# Altium PCB LST.PcbDoc (part 6 of 6)
Units mil, origin at the board's own origin, x right, y up, seen from the top; angles counter-clockwise.
Board outline 4330.71 x 4330.71 mil, 2 copper layers (Top Layer, Bottom Layer), stack 50 mil thick; 464 components, 242 nets, 1328 pads, 128 vias.
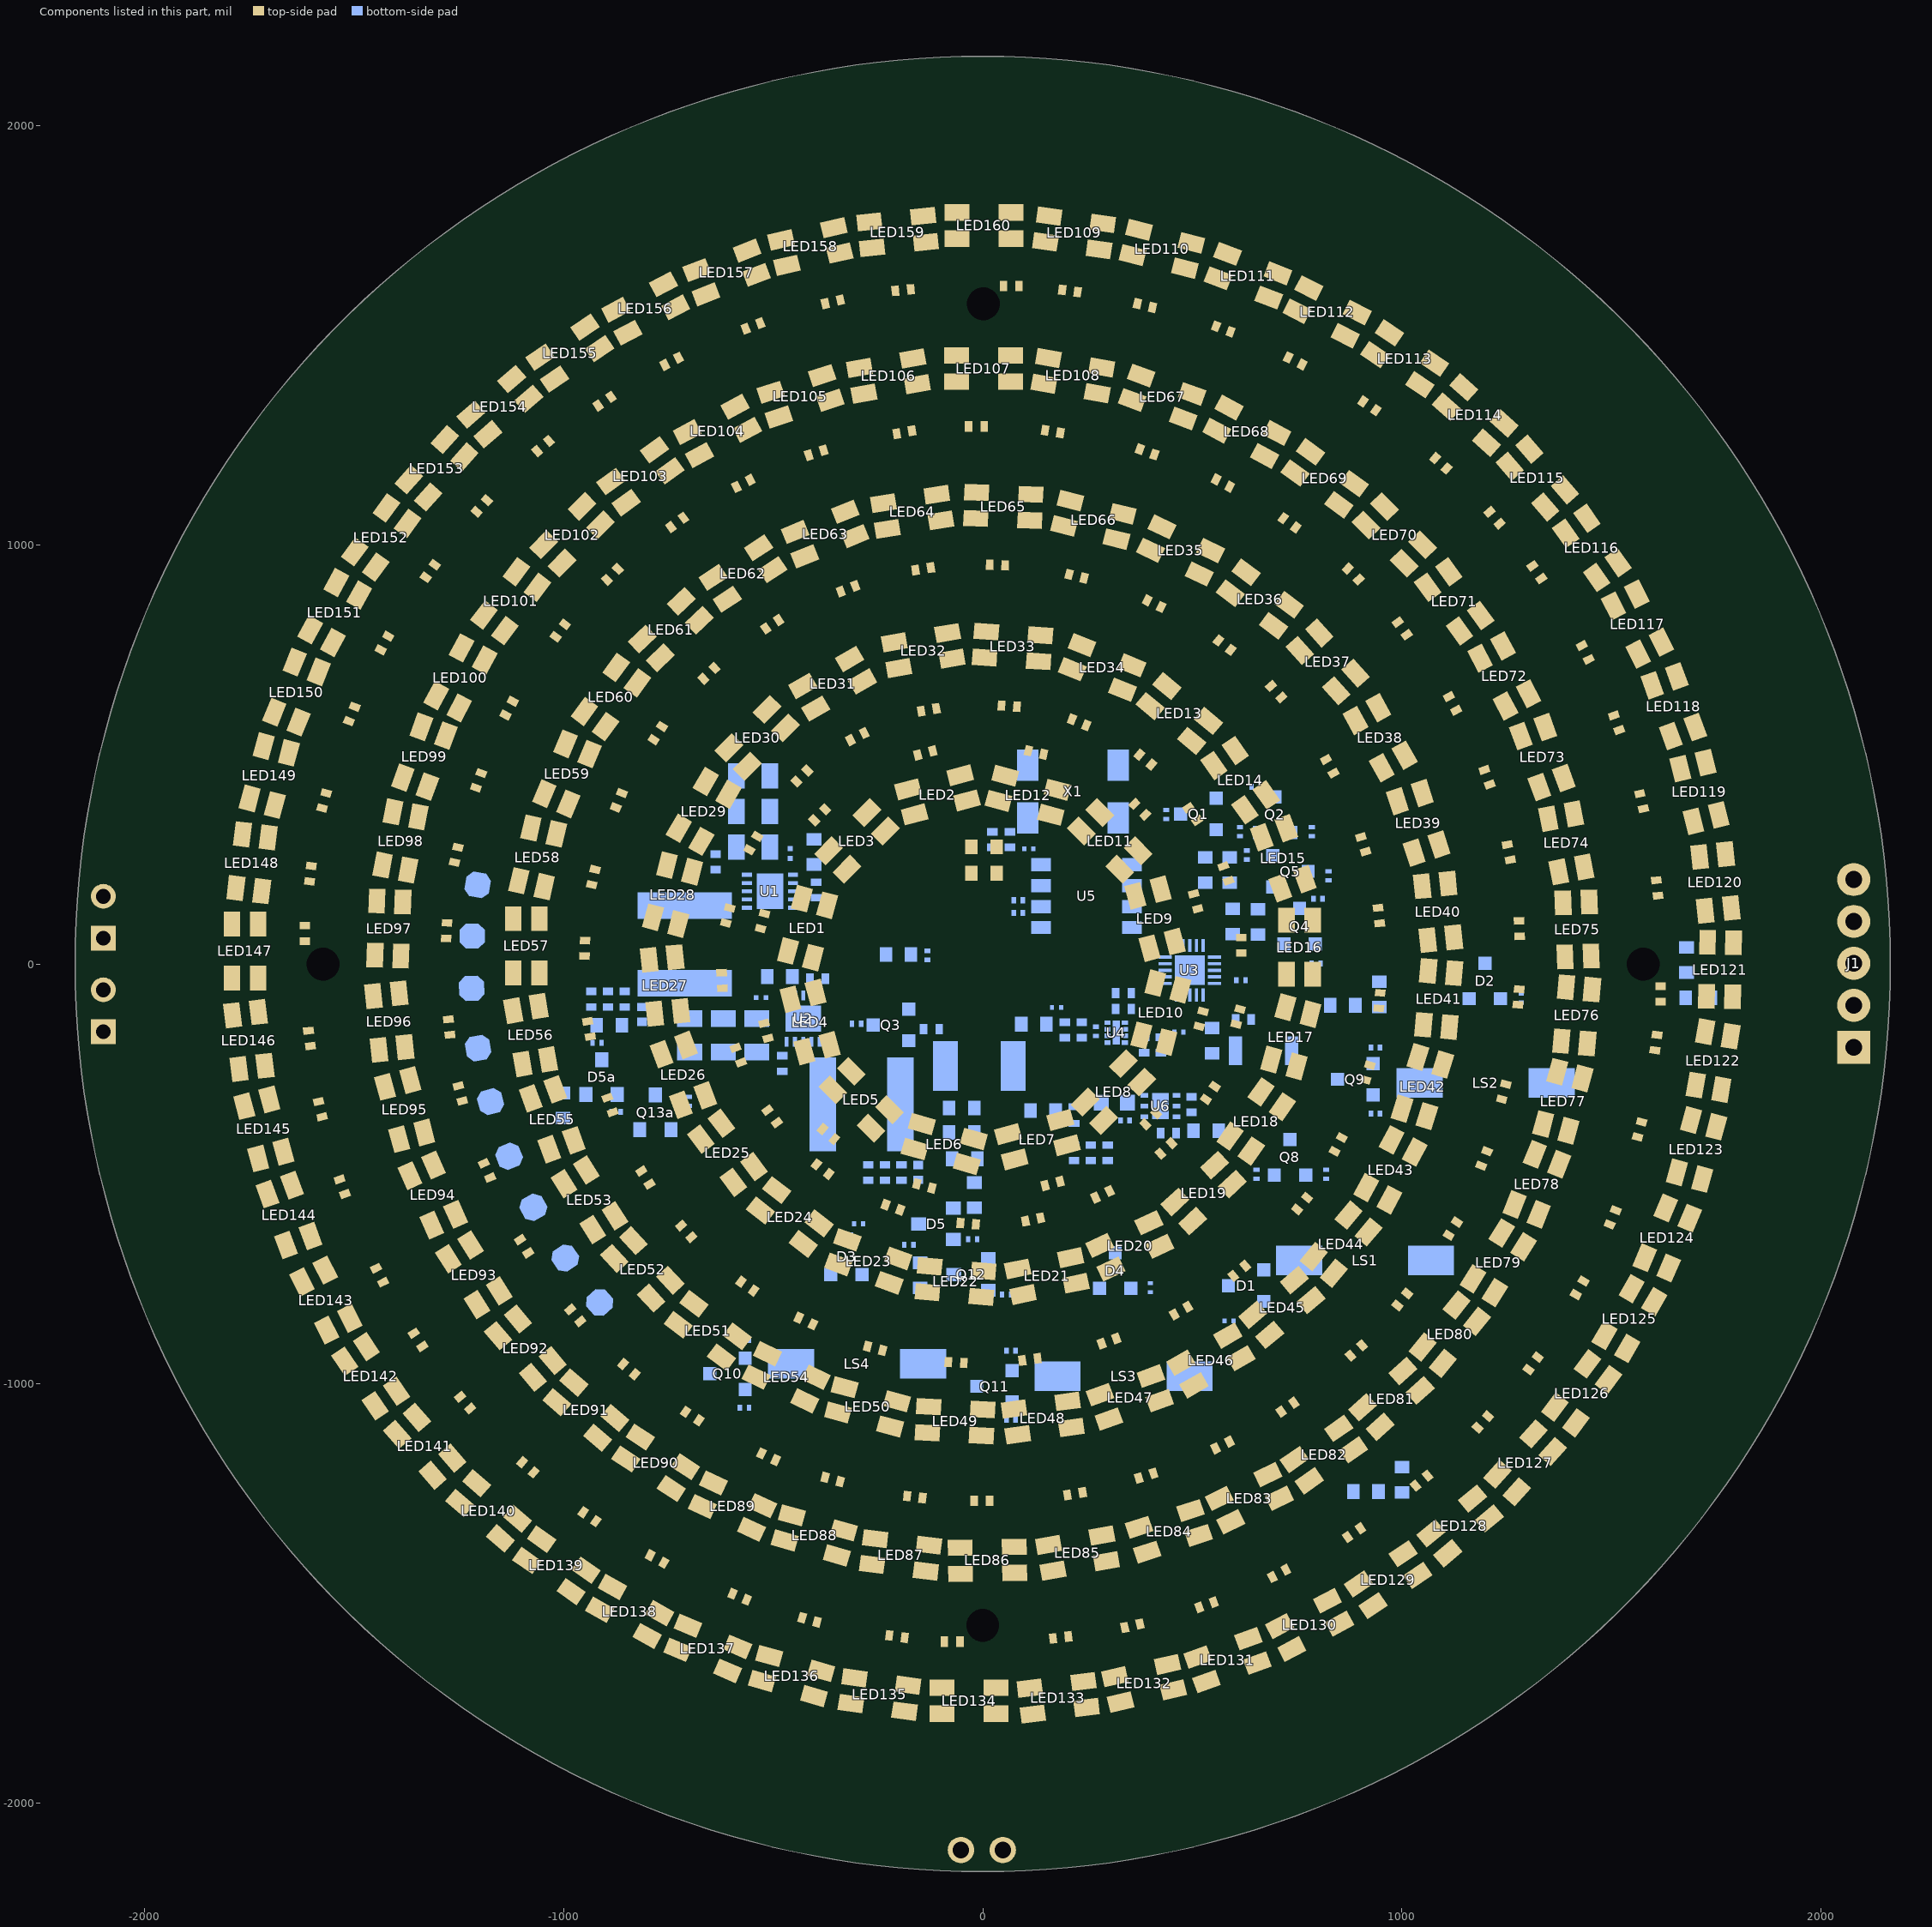
[diagram p5: the components of this part, seen from the top]

## Polygon pours and split planes (outlines as drawn)
GND on Bottom Layer "Polygonpour2" (hatched 45Degree grid 20 track 8, remove dead copper, pour order 8): -377.67,-2026.39 -631.31,-1961.39 -810.31,-1893.39 -972.31,-1811.39 -1166.31,-1692.39 -1305.31,-1580.39 -1441.31,-1456.39 -1553.31,-1311.39 -1544.31,-1348.39 -1616.31,-1253.39 -1741.06,-1076.39 -1876.31,-819.39 -1977.31,-528.39 -2030.31,-234.39 -2043.31,27.56 -2030.31,244.61 -1985.31,485.61 -1912.31,714.61 -1825.31,909.61 -1713.31,1106.61 -1500.31,1388.61 -1342.31,1546.61 -1118.31,1718.61 -838.71,1872.61 -516.31,1990.61 -326.31,2027.61 -65.32,2057.61 187.69,2054.61 435.69,2017.61 625.69,1970.61 776.69,1914.61 966.69,1828.61 1122.69,1740.61 1327.69,1593.61 1555.69,1375.61 1725.69,1158.61 1861.69,930.61 1978.69,648.59 2029.69,476.61 2060.69,297.8 2076.69,181.61 2083.69,-27.39 2070.69,-230.39 2040.69,-439.39 1930.69,-787.39 1828.69,-993.39 1732.69,-1152.39 1644.1,-1277.39 1479.69,-1462.39 1340.69,-1586.39 1147.69,-1732.39 950.76,-1841.39 817.69,-1895.39 584.69,-1987.39 297.69,-2044.39 120.69,-2063.39 -152.62,-2057.39 -349.31,-2027.39 -385.31,-2020.39 -383.31,-2020.39
no net on Bottom Layer "Bottom Layer-No Net" (solid, pour order 0): 265,-311.61
GND on Top Layer "Polygonpour1" (hatched 45Degree grid 20 track 8, remove dead copper, pour order 4): -385.36,-2034 -639,-1969 -818,-1901 -980,-1819 -1174,-1700 -1313,-1588 -1449,-1464 -1561,-1319 -1552,-1356 -1624,-1261 -1748.75,-1084 -1884,-827 -1985,-536 -2038,-242 -2051,19.95 -2038,237 -1993,478 -1920,707 -1833,902 -1721,1099 -1508,1381 -1350,1539 -1126,1711 -846.41,1865 -524,1983 -334,2020 -73.01,2050 180,2047 428,2010 618,1963 769,1907 959,1821 1115,1733 1320,1586 1548,1368 1718,1151 1854,923 1971,640.98 2022,469 2053,290.19 2069,174 2076,-35 2063,-238 2033,-447 1923,-795 1821,-1001 1725,-1160 1636.4,-1285 1472,-1470 1333,-1594 1140,-1740 943.07,-1849 810,-1903 577,-1995 290,-2052 113,-2071 -160.31,-2065 -357,-2035 -393,-2028 -391,-2028

## Other copper
Bottom Layer:
  rectangle net V_MCU: 177,-147 251,-93
  rectangle net V_MCU: 176,-160 304,-122
  rectangle net GND: -217,-839 -130,-751
  rectangle net GND: -217,-788 -182,-501
  rectangle net GND: -287.59,-557 -182,-503
  rectangle net V_O1: -175,-741 -131,-500
  rectangle net VIN: -290,-495 -142,-220
  rectangle net GND: -734,-164.61 -386,-95.61
  rectangle net GND: -540,131.39 -471,479.39
  rectangle net VDD: 332,-159.61 365,-52.61
  rectangle net GND: 408,-325.61 514,-302.61
  rectangle net GND: 400,-479.61 445,-302.61
  rectangle net GND: 205,-490.61 445,-459.61
  rectangle net VDD: 33,169.39 106,296
  rectangle net VDD: 9,108.39 85,295.39
  rectangle net GND: 10,305.79 139.28,515.39
  rectangle net V_OUT_2: -725,240.61 -549,479.39
  rectangle net GND: 176,-220.61 251,-165
  rectangle net GND: 194,-218.61 326,-181.61
  rectangle net GND: 310,-181.61 326,-57.61
  rectangle net GND: 196,-220.61 472,-199.61
  rectangle net VDD: 352,-191.61 465,-149.61
  rectangle net V_OUT_1: -457.48,-271.44 -424,-172
  rectangle net V_OUT_1: -524,-281 -424,-234.61
  rectangle net V_OUT_1: -735,-281 -504,-171.61
  rectangle net BAT_IN: -125,-432.61 -52,-120.61
  rectangle net V_BAT: -43,-551.61 132,-118.61
  rectangle net V_TR_O: 451,-417.72 527,-332
  rectangle net V_TR: 265,-386.61 322,-307.61
  rectangle net V_TR: 203,-442.61 335,-355.61

## Silkscreen, mask and mechanical layers (free items; w line width, h text height)
Top Overlay:
  text "@" at -125,1599.39 h40 r95
  text "@" at 129,1598.39 h40 r88
  text "@" at 269,1581.39 h40 r82
  text "@" at -293,1576.39 h40 r100
  text "@" at 443,1541.39 h40 r76
  text "@" at -482,1530.39 h40 r109
  text "@" at 628,1477.39 h40 r69
  text "@" at -678,1454.39 h40 r117
  text "@" at 795,1395.39 h40 r63
  text "@" at -843,1363.39 h40 r122
  text "@" at 959,1283.39 h40 r56
  text "@" at 46,1266.39 h40 r88
  text "@" at -989,1262.39 h40 r129
  text "@" at -124,1260.39 h40 r95
  text "@" at 227,1246.39 h40 r80
  text "@" at -333,1222.39 h40 r105
  text "@" at 444,1185.39 h40 r70
  text "@" at -508,1160.39 h40 r113
  text "@" at 1126,1141.39 h40 r48
  text "@" at -1139,1127.39 h40 r134
  text "@" at 619,1105.39 h40 r62
  text "@" at -669,1074.39 h40 r120
  text "@" at 1249,1007.39 h40 r41
  text "@" at 772,1003.39 h40 r54
  text "@" at -1270,978.39 h40 r143
  text "@" at -822,965.39 h40 r130
  text "@" at -78,935.09 h40 r96
  text "@" at 98,933.39 h40 r85
  text "@" at -257,901.39 h40 r108
  text "@" at 282,894.39 h40 r76
  text "@" at 917,876.39 h40 r45
  text "@" at 1344,873.39 h40 r35
  text "@" at -957,829.39 h40 r140
  text "@" at -439,828.39 h40 r120
  text "@" at 457.84,817.39 h40 r62
  text "@" at -1383,813.39 h40 r150
  text "@" at 1024,743.39 h40 r36
  text "@" at -594,722.39 h40 r130
  text "@" at 613,710.39 h40 r53
  text "@" at 1452,681.39 h40 r27
  text "@" at -1082,659.39 h40 r152
  text "@" at -1466,646.39 h40 r156
  text "@" at -66,602.39 h40 r97
  text "@" at 123,593.7 h40 r85
  text "@" at 726,592.39 h40 r40
  text "@" at -728,590.39 h40 r145
  text "@" at 1135,560.39 h40 r28
  text "@" at -238,557.39 h40 r117
  text "@" at 280,538.39 h40 r65
  text "@" at 1519,512.39 h40 r20
  text "@" at -72,501.67 h40 r100
  text "@" at -1167,491.39 h40 r160
  text "@" at 181,475.39 h40 r70
  text "@" at -378,473.39 h40 r130
  text "@" at -1538,445.39 h40 r163
  text "@" at -829,441.39 h40 r158
  text "@" at 420,434.39 h40 r50
  text "@" at 842,408.39 h40 r29
  text "@" at -331.03,386.39 h40 r130
  text "@" at 1208,379.39 h40 r18
  text "@" at -503,341.39 h40 r150
  text "@" at 1571,323.39 h40 r14
  text "@" at -1225,320.39 h40 r167
  text "@" at 407,313.39 h40 r45
  text "@" at 524,299.39 h40 r35
  text "@" at -1581,274.39 h40 r170
  text "@" at -897,264.39 h40 r166
  text "@" at 909,221.39 h40 r18
  text "@" at 1251,204.39 h40 r10
  text "@" at -581,173.39 h40 r165
  text "@" at -492,158.39 h40 r165
  text "@" at 586,154.39 h40 r20
  text "@" at -1259,140.39 h40 r177
  text "@" at -1597,136.39 h40 r176
  text "@" at 1599,118.39 h40 r6
  text "@" at -931,99.39 h40 r178
  text "@" at 504,85.39 h40 r10
  text "@" at 935,52.39 h40 r6
  text "@" at 1266,25.39 h40
  text "@" at -607,24.39 h40 r183
  text "@" at 603,-14.61 h40
  text "@" at -1261,-81.61 h40 r186
  text "@" at -933,-91.61 h40 r188
  text "@" at -514,-92.61 h40 r195
  text "@" at -1595,-113.61 h40 r183
  text "@" at 1598,-132.61 h40
  text "@" at 1257,-134.61 h40 r350
  text "@" at 924,-147.61 h40 r355
  text "@" at -590,-154.61 h40 r197
  text "@" at 575,-180.61 h40 r345
  text "@" at 487,-189.61 h40 r345
  text "@" at -1243,-242.61 h40 r193
  text "@" at 1580,-246.61 h40 r352
  text "@" at -897,-270.61 h40 r200
  text "@" at -1578,-281.61 h40 r193
  text "@" at -523,-303.61 h40 r212
  text "@" at 883,-313.61 h40 r343
  text "@" at 492,-343.61 h40 r325
  text "@" at -402,-351 h40 r225
  text "@" at 1213,-358.61 h40 r345
  text "@" at 343,-400.61 h40 r315
  text "@" at -1190,-429.61 h40 r200
  text "@" at -418,-437 h40 r230
  text "@" at -821,-444.61 h40 r210
  text "@" at 1534,-448.61 h40 r345
  text "@" at -1533,-468.61 h40 r200
  text "@" at 381,-468.61 h40 r313
  text "@" at 804,-477.61 h40 r332
  text "@" at -194,-493.61 h40 r254
  text "@" at 1158,-514.61 h40 r338
  text "@" at 103,-520.61 h40 r280
  text "@" at -264,-541.61 h40 r245
  text "@" at 224,-561.61 h40 r295
  text "@" at -739,-580.61 h40 r225
  text "@" at -92,-594.61 h40 r261
  text "@" at 58,-601.61 h40 r276
  text "@" at -1110,-606.61 h40 r210
  text "@" at 708,-606.61 h40 r318
  text "@" at 1462,-653.61 h40 r335
  text "@" at 1069,-672.61 h40 r328
  text "@" at -1453,-679.61 h40 r207
  text "@" at -602,-715.75 h40 r230
  text "@" at 552,-757.61 h40 r310
  text "@" at -999,-778.61 h40 r220
  text "@" at -470,-808.61 h40 r245
  text "@" at 1378,-815.61 h40 r329
  text "@" at -1366,-833.61 h40 r210
  text "@" at 949,-835.61 h40 r321
  text "@" at 410,-841.61 h40 r300
  text "@" at -312,-882 h40 r250
  text "@" at 236,-901.61 h40 r286
  text "@" at -874,-915.61 h40 r225
  text "@" at -123,-928.7 h40 r260
  text "@" at 50,-937.61 h40 r278
  text "@" at 833,-951.61 h40 r312
  text "@" at -1262,-986.61 h40 r220
  text "@" at 1261,-987.61 h40 r322
  text "@" at -736,-1028.61 h40 r237
  text "@" at 668,-1075.61 h40 r302
  text "@" at 1138,-1127.61 h40 r318
  text "@" at -559,-1132.61 h40 r245
  text "@" at -1122,-1147.61 h40 r228
  text "@" at 510,-1159.61 h40 r296
  text "@" at -412,-1195.61 h40 r254
  text "@" at 327,-1222.61 h40 r286
  text "@" at -222,-1245.61 h40 r260
  text "@" at 157,-1256.61 h40 r277
  text "@" at 991,-1258.61 h40 r309
  text "@" at -62,-1263.61 h40 r268
  text "@" at -980,-1268.61 h40 r235
  text "@" at -823,-1374.61 h40 r240
  text "@" at 825,-1374.61 h40 r300
  text "@" at 646,-1467.61 h40 r297
  text "@" at -634,-1471.61 h40 r249
  text "@" at -468,-1530.61 h40 r253
  text "@" at 468,-1532.61 h40 r289
  text "@" at 294,-1574.61 h40 r279
  text "@" at -263,-1578.61 h40 r260
  text "@" at -136,-1596.61 h40 r268
  text "@" at 124,-1596.61 h40 r275
Bottom Overlay:
  text "#" at -641,454.39 h40
  text "@ >> 100nf" at 2032,394.39 h80
  text "#" at -641,369.39 h40
  text "# >> 22uf" at 2032,325.57 h80
  text "#" at -641,288.39 h40
  text "# >> 1uf" at 2032,267.33 h80
  text "$" at 26,253.39 h40 r180
  text "GND" at -1261,184.39 h60 r350
  text "GND" at 2027,173.39 h80
  text "RESET#" at 2026,68.37 h80
  text "GND" at -1271,50.77 h60
  text "$" at -860,-38.02 h40
  text "RX" at 2036,-47.58 h80
  text "VCC_L2" at -1271,-74.61 h60 r2
  text "$" at 376,-79.61 h40
  text "$" at 416,-147.61 h40
  text "TX" at 2036,-152.59 h80
  text "$" at -149,-210.61 h40
  text "VCC_L1" at -1254,-222.61 h60 r10
  text "$" at 183,-225.61 h40
  text "VDD" at 2026,-247.61 h80
  text "#" at -688,-270.61 h40
  text "#" at -608,-270.61 h40
  text "#" at -527,-270.61 h40
  text "BAT_IN" at -1223,-355.61 h60 r15
  text "$" at 531,-358.61 h40
  text "$" at 173,-454.61 h40
  text "V_BAT" at -1173,-489.61 h60 r22
  text "$" at -286,-571 h40
  text "VCC" at -1107,-626.61 h60 r29
  text "VDD" at -1027,-749.61 h60 r35
  text "CLK_OUT" at -942,-854.61 h60 r42
  text "BATTERY" at 153,-2054.61 h75
  text "-VE" at -113,-2132.61 h80
  text "+VE" at 236,-2132.61 h80
Mechanical 1:
  circle w10: c0,1 r314.96
  circle w10: c-1,-12.61 r511.81
  circle w10: c0,1 r645.67
  circle w10: c0,1 r842.52
  circle w10: c0,1 r976.38
  circle w10: c0,1 r1173.23
  circle w10: c0,1 r1307.09
  circle w10: c0,0 r1503.94
  circle w10: c0,1 r1643.7
  circle w10: c0,1 r1840.55
  circle w10: c16,-10 r2065.35
  lines w10: -2164,0 0,0 ; 0,-2164.61 0,0 ; 0,2167.39 0,0 ; 2164.61,0 0,0
Mechanical 2:
  circle w10: c0,1 r2165.35
  circle w10: c0,1 r98.43